# Altium PCB PCB_LogNController-v1.1.PcbDoc (part 2 of 3)
Units mil, origin at the board's own origin, x right, y up, seen from the top; angles counter-clockwise.
Board outline 7018 x 7081 mil, 2 copper layers (Top Layer, Bottom Layer), stack 61.811 mil thick; 172 components, 114 nets, 574 pads, 361 vias.
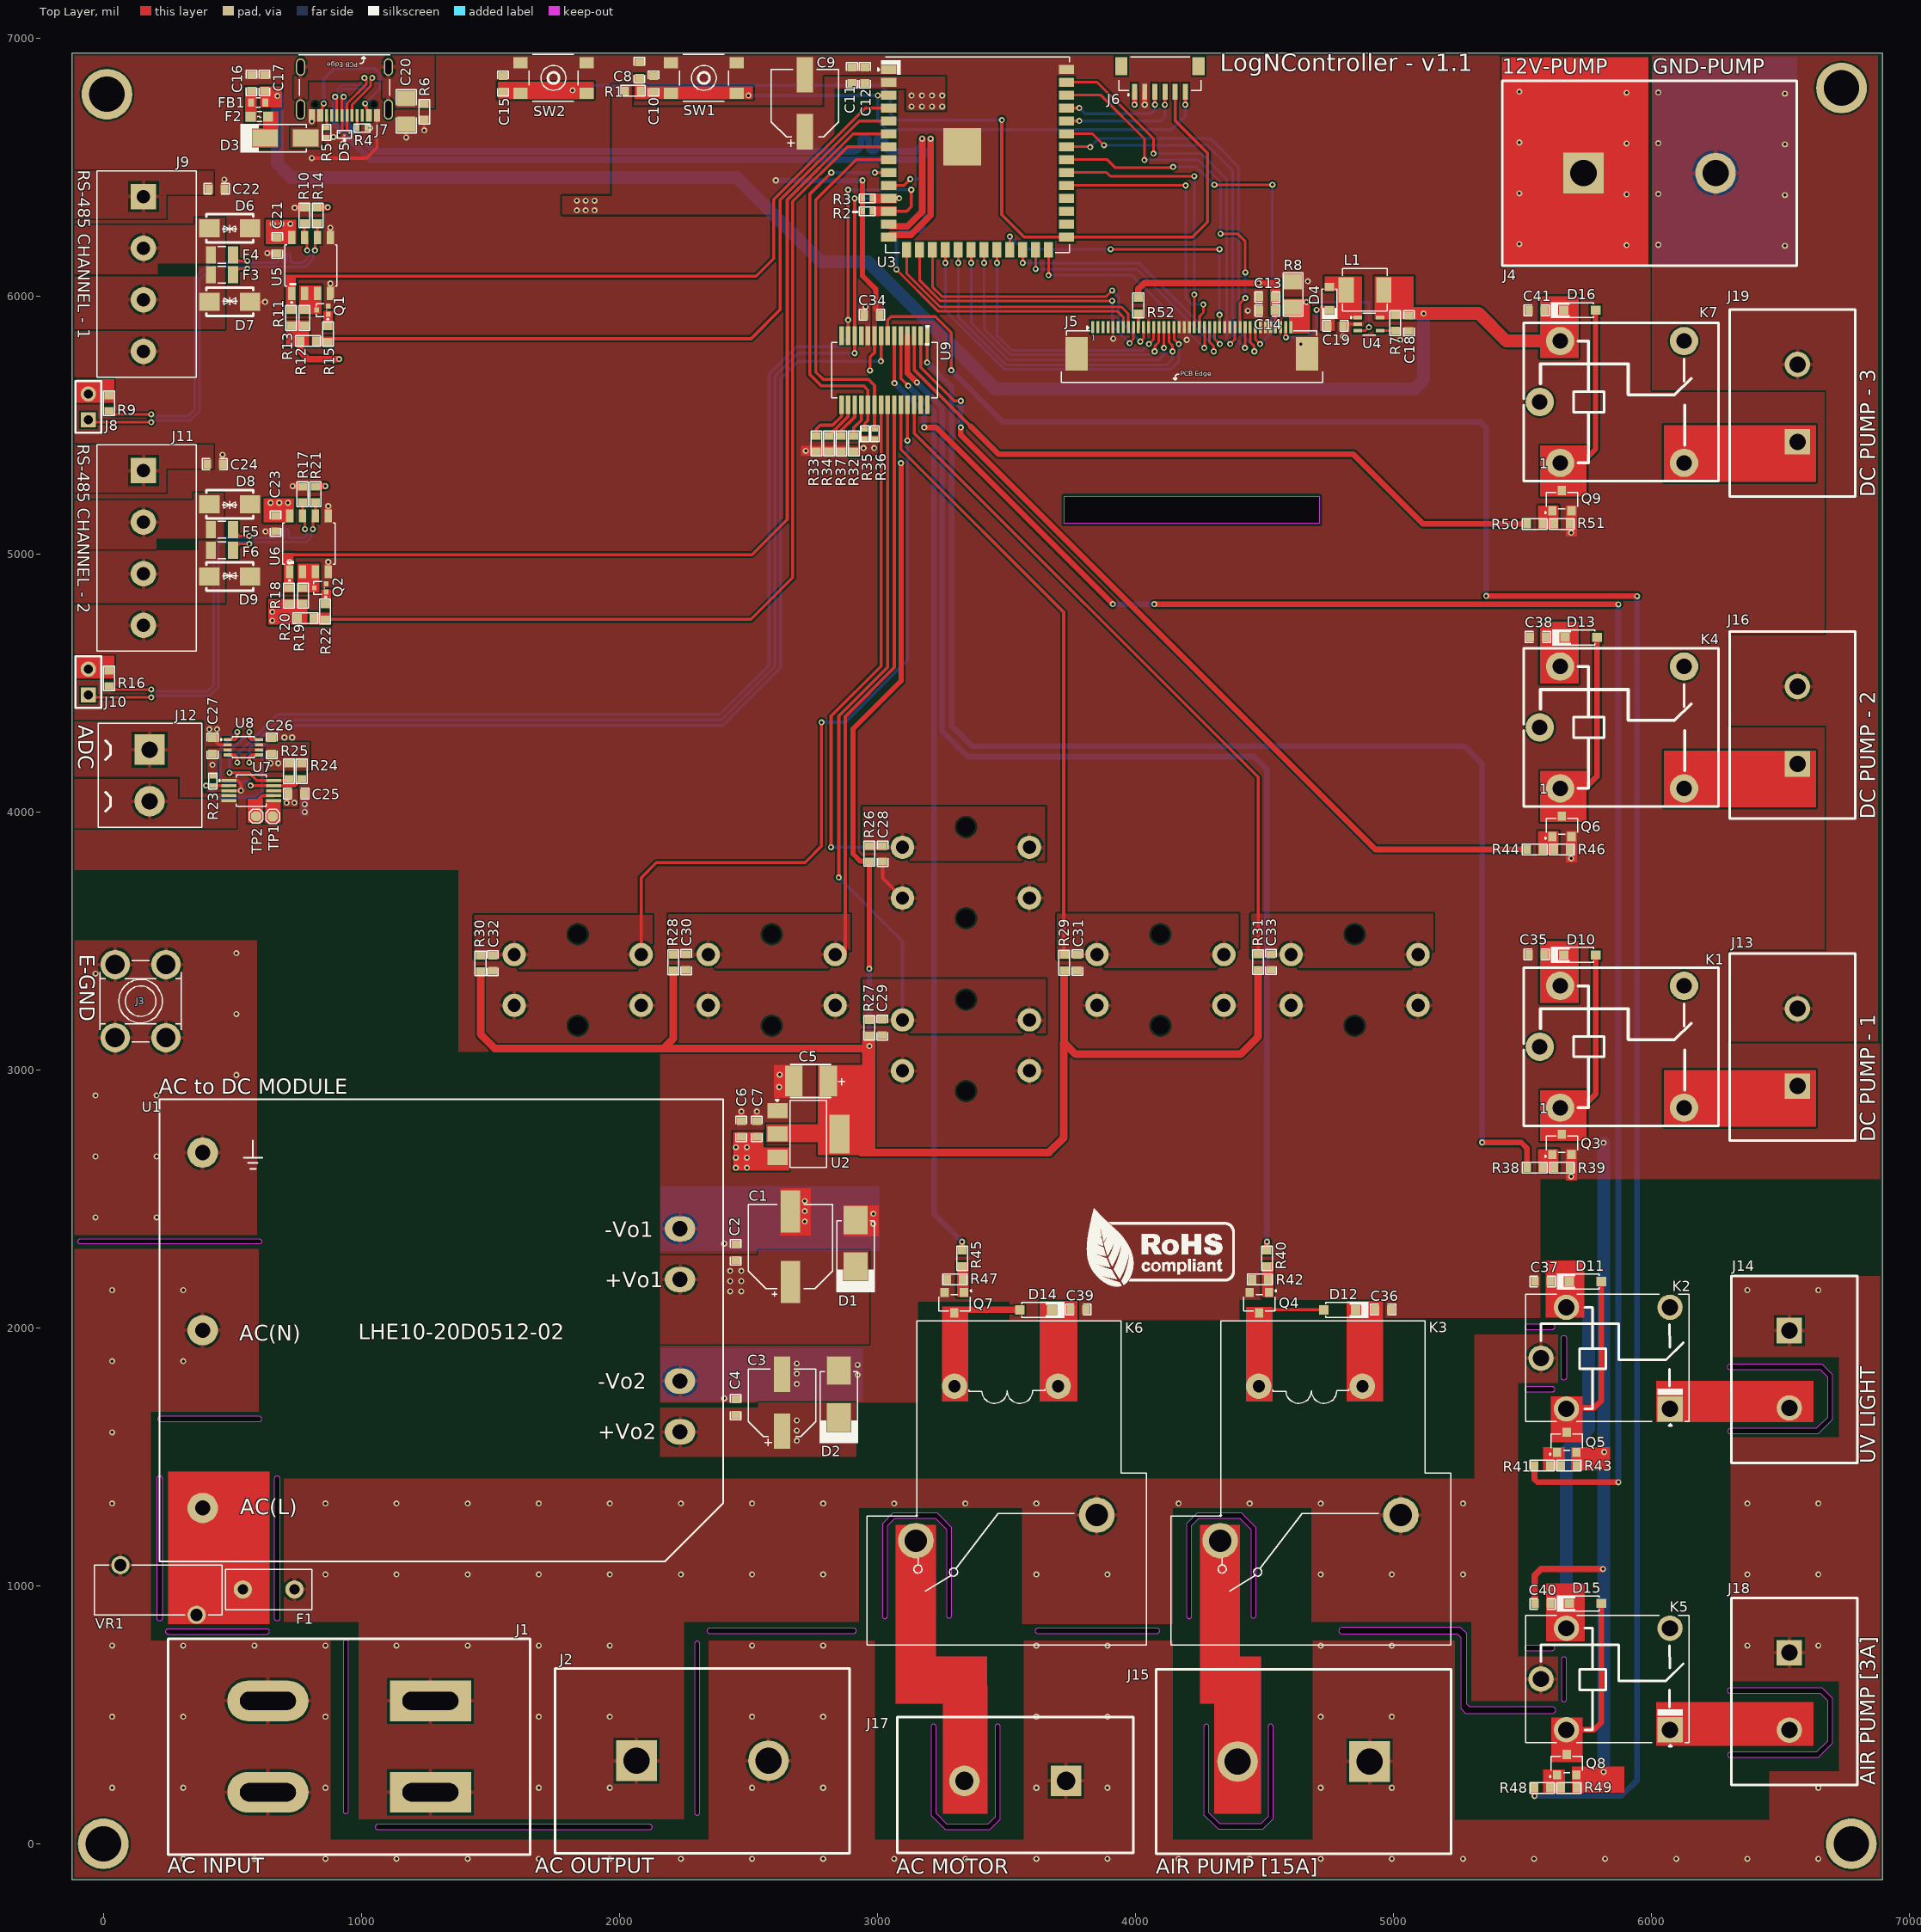
[diagram p0: Top Layer view]

## Part data (continued)
FB1: "FERRITE BEAD 120 OHM 0603 1LN", Case Code (Imperial)=0603, Case Code (Metric)=1608, Current Rating=3A, DC Resistance (DCR)=25mR, Frequency=100MHz, LCSC Part Number=C113030, Manufacturer=Murata, Max Operating Temperature=125°C, Min Operating Temperature=-55°C, Package Quantity=1, Tolerance=25%, Case/Package=0603, Category="Ferrite Beads and Chips", ComponentLink1Description=https://datasheet.ciiva.com/1012/l0110s0100blm18s-1012624.pdf?src-supplier=Digi-Key, ComponentLink1URL=https://datasheet.ciiva.com/1012/l0110s0100blm18s-1012624.pdf?src-supplier=Digi-Key, ComponentLink2Description=https://datasheet.ciiva.com/11799/0900766b811b5866-11799181.pdf?src-supplier=RSComponents, ComponentLink2URL=https://datasheet.ciiva.com/11799/0900766b811b5866-11799181.pdf?src-supplier=RSComponents, ComponentLink3Description=https://datasheet.ciiva.com/18093/getdatasheetpartid-295885-18093249.pdf?src-supplier=Verical, ComponentLink3URL=https://datasheet.ciiva.com/18093/getdatasheetpartid-295885-18093249.pdf?src-supplier=Verical, ComponentLink4Description=https://datasheet.ciiva.com/41449/001171723-da-01-en-chip-drossel0603-120r-3000ma-1-6x0-8mm-41449353.pdf?src-supplier=Conrad, ComponentLink4URL=https://datasheet.ciiva.com/41449/001171723-da-01-en-chip-drossel0603-120r-3000ma-1-6x0-8mm-41449353.pdf?src-supplier=Conrad, ComponentLink5Description=https://datasheet.ciiva.com/41449/001172312-da-01-en-drossel-0603-120r-1-6x0-8mm-10000st-41449675.pdf?src-supplier=Conrad, ComponentLink5URL=https://datasheet.ciiva.com/41449/001172312-da-01-en-drossel-0603-120r-1-6x0-8mm-10000st-41449675.pdf?src-supplier=Conrad, ComponentLink6Description=https://datasheet.ciiva.com/8021/5151-8021511.pdf?src-supplier=Element14, ComponentLink6URL=https://datasheet.ciiva.com/8021/5151-8021511.pdf?src-supplier=Element14, ComponentLink7Description=https://datasheet.ciiva.com/8021/5151-8021512.pdf?src-supplier=Element14, ComponentLink7URL=https://datasheet.ciiva.com/8021/5151-8021512.pdf?src-supplier=Element14, ComponentLink8Description=https://datasheet.ciiva.com/14122/blm-series-eng-tds-14122906.pdf?src-supplier=Distrelec, ComponentLink8URL=https://datasheet.ciiva.com/14122/blm-series-eng-tds-14122906.pdf?src-supplier=Distrelec, ComponentLink9Description=https://datasheet.ciiva.com/1012/l0110s0100blm18s-1012623.pdf?src-supplier=Digi-Key, ComponentLink9URL=https://datasheet.ciiva.com/1012/l0110s0100blm18s-1012623.pdf?src-supplier=Digi-Key, ComponentLink10Description=https://datasheet.ciiva.com/1012/l0110s0100blm18s-1012625.pdf?src-supplier=Digi-Key, ComponentLink10URL=https://datasheet.ciiva.com/1012/l0110s0100blm18s-1012625.pdf?src-supplier=Digi-Key, ComponentLink11Description=https://datasheet.ciiva.com/16395/l0110s0100blm18s-16395498.pdf?src-supplier=Future+Electronics, ComponentLink11URL=https://datasheet.ciiva.com/16395/l0110s0100blm18s-16395498.pdf?src-supplier=Future+Electronics, Core Material=Ferrite, DC Resistance-Max=25mR, Depth=0.8mm, Height=0.8mm, Impedance=120R, Item Type="Ferrite Bead", Lead Free="Lead Free", Length=1.6mm, Manufacturer Part Number=BLM18SG121TN1D, Material=Steel,Ferrite, Max Current Rating=3A, Max DC Current=3A, Number of Circuits=1, Number of Lines=1, Number of Pins=2, Packaging="Tape and Reel", Pricing 1="1=0.12640, 10=0.08350, 25=0.07210, 100=0.05150, 250=0.04730, 500=0.04110, 1000=0.03420, 3000=0.03360, 6000=0.03320, 15000=0.03270, 30000=0.03200, 75000=0.03150 (USD)", Reach SVHC Compliant=Yes, RoHS=Yes, RoHS Compliant=Yes, Series=BLM18S, Shielding=Unshielded, Stock 1=82612, Supplier 1="Arrow Electronics", Supplier Part Number 1=BLM18SG121TN1D, Termination=SMD/SMT, Test Frequency=100MHz, Width=0.8mm
J1: "1x2P Barrier Block 2 1 16mm -40℃~+105℃ 76A 1kV Black 6~14 Straight pin 16 Plugin,P=16mm Barrier Terminal Blocks ROHS", LCSC Part Number=C707749, Manufacturer="CiXi KaiFeng Electronics", ComponentLink1Description=LCSC, ComponentLink1URL=https://www.lcsc.com/product-detail/Barrier-Terminal-Blocks_Cixi-Kefa-Elec-KF88SA-16-0-2P_C707749.html, Item Type="Terminal Block", Manufacturer Part Number=KF88SA-16.0-2P, RoHS=No, Supplier=LCSC
J2 J4 J15: "1x2P Midfoot Barrier Block 2 1 13mm 40A -40℃~+105℃ 750V Black 10~18 Straight pin 6 Plugin,P=13mm Barrier Terminal Blocks ROHS", LCSC Part Number=C707721, Manufacturer="CiXi KaiFeng Electronics", Item Type="Terminal Block", Manufacturer Part Number=KF78C-13.0-2P, RoHS=No, Supplier=LCSC
J3: "M4 Plugin PCB Welding Terminal ROHS", Manufacturer=XFCN, Package=Plugin, ComponentLink1Description=LCSC, Manufacturer Part Number=T44001
J5: "SMD,P=0.5mm,Surface Mount，Right Angle", LCSC Part Number=C262648, Manufacturer=Jushuo, Item Type="FFC/FPC Connector", Manufacturer Part Number=AFC07-S40ECA-00, RoHS=No, Supplier=LCSC
J6: library part C145963, "1x6P SH 1 1mm 6 SMD,P=1mm Wire To Board / Wire To Wire Connector ROHS", Manufacturer=BOOMELE, Package=SMD,P=1mm, ComponentLink1Description=LCSC, ComponentLink1URL=https://www.lcsc.com/product-detail/Wire-To-Board-Wire-To-Wire-Connector_BOOMELE-Boom-Precision-Elec-C145963_C145963.html, Item Type=Connector, LCSC Part Number=C145963, Manufacturer Part Number=C145963
J7: "5A 1 16P Female Type-C SMD USB Connectors ROHS", LCSC Part Number=C165948, Manufacturer="Korean Hroparts Elec", ComponentLink1Description=LCSC, ComponentLink1URL=https://www.lcsc.com/product-detail/USB-Connectors_Korean-Hroparts-Elec-TYPE-C-31-M-12_C165948.html, Item Type="USB Connector", Manufacturer Part Number=TYPE-C-31-M-12
J8 J10: "Gold 250V 3A Straight Square Pins 2.5mm 2P 260℃ 6mm -40℃~+105℃ 3mm 2.54mm Plugin Black Brass 1x2P Plugin,P=2.54mm Pin Headers ROHS", LCSC Part Number=C706874, Manufacturer=XKB, Package=Plugin,P=2.54mm, ComponentLink1Description=LCSC, ComponentLink1URL=https://www.lcsc.com/product-detail/Pin-Headers_XKB-Connectivity-X6511WV-02H-C60D30_C706874.html, Item Type="Male Header", Manufacturer Part Number=X6511WV-02H-C60D30
J9 J11: "TERM BLK 4P SIDE ENT 5.08MM PCB", Manufacturer="Phoenix Contact", Supplier Part Number=277-1265-ND, ComponentLink1Description=https://datasheet.ciiva.com/16071/1715747-16071928.pdf?src-supplier=Onlinecomponents.com, ComponentLink1URL=https://datasheet.ciiva.com/16071/1715747-16071928.pdf?src-supplier=Onlinecomponents.com, ComponentLink2Description=https://datasheet.ciiva.com/23596/100425-23596240.pdf?src-supplier=Newark, ComponentLink2URL=https://datasheet.ciiva.com/23596/100425-23596240.pdf?src-supplier=Newark, ComponentLink3Description=https://datasheet.ciiva.com/15169/getdatasheetpartid-227081-15169962.pdf?src-supplier=Verical, ComponentLink3URL=https://datasheet.ciiva.com/15169/getdatasheetpartid-227081-15169962.pdf?src-supplier=Verical, ComponentLink4Description=https://datasheet.ciiva.com/11757/0900766b811d7317-11757713.pdf?src-supplier=Rs, ComponentLink4URL=https://datasheet.ciiva.com/11757/0900766b811d7317-11757713.pdf?src-supplier=Rs, ComponentLink5Description=https://datasheet.ciiva.com/824/1715747-824336.pdf?src-supplier=Digikey, ComponentLink5URL=https://datasheet.ciiva.com/824/1715747-824336.pdf?src-supplier=Digikey, ComponentLink6Description=https://datasheet.ciiva.com/1120/1731555-1120440.pdf?src-supplier=Farnell, ComponentLink6URL=https://datasheet.ciiva.com/1120/1731555-1120440.pdf?src-supplier=Farnell, ComponentLink7Description=https://datasheet.ciiva.com/1118/1731555-1118428.pdf?src-supplier=Element14, ComponentLink7URL=https://datasheet.ciiva.com/1118/1731555-1118428.pdf?src-supplier=Element14, ComponentLink8Description=https://datasheet.ciiva.com/33106/1715747-33106010.pdf?src-supplier=Today+Components, ComponentLink8URL=https://datasheet.ciiva.com/33106/1715747-33106010.pdf?src-supplier=Today+Components, ComponentLink9Description=https://datasheet.ciiva.com/29218/743477-da-01-en-printklemmenblock-mkds-1-5-4-5-08-29218070.pdf?src-supplier=Conrad, ComponentLink9URL=https://datasheet.ciiva.com/29218/743477-da-01-en-printklemmenblock-mkds-1-5-4-5-08-29218070.pdf?src-supplier=Conrad, Item Type="Terminal Blocks", Manufacturer Part Number=1715747, Pricing="1=2.39, 10=2.287, 50=2.188, 100=2.1282, 250=1.989, 500=1.82988, 1000=1.79562 (USD)", RoHS=Yes, Stock=3401, Supplier=Digikey
J12: "1x2P 18A -40℃~+105℃ 250V Black 12~30 Straight pin 5.08mm 2.5 1 2 Plugin,P=5.08mm Screw terminal ROHS", LCSC Part Number=C430601, Manufacturer=DIBO, Package=Plugin,P=5.08mm, ComponentLink1Description=LCSC, ComponentLink1URL=https://www.lcsc.com/product-detail/Screw-terminal_span-style-background-color-ff0-DIBO-span-DB128L-5-08-2P-BK-S_C430601.html, Item Type="Terminal Block", Manufacturer Part Number=DB128L-5.08-2P-BK-S
J13 J14 J16 J18 J19: "1x2P Midfoot Barrier Block 2 1 7.62mm 24A -40℃~+105℃ 250V Black 12~22 Straight pin 2.5 Plugin,P=7.62mm Barrier Terminal Blocks ROHS", LCSC Part Number=C707609, Manufacturer="CiXi KaiFeng Electronics", ComponentLink1Description=LCSC, ComponentLink1URL=https://www.lcsc.com/product-detail/Barrier-Terminal-Blocks_Cixi-Kefa-Elec-KF28C-7-62-2P_C707609.html, Item Type="Terminal Block", Manufacturer Part Number=KF28C-7.62-2P, RoHS=No, Supplier=LCSC
J17: "1x2P Midfoot Barrier Block 2 1 10mm -40℃~+105℃ 32A 750V Black 12~22 Straight pin 4 Plugin,P=10mm Barrier Terminal Blocks ROHS", LCSC Part Number=C707693, Manufacturer="CiXi KaiFeng Electronics", ComponentLink1Description=LCSC, ComponentLink1URL=https://www.lcsc.com/product-detail/Barrier-Terminal-Blocks_Cixi-Kefa-Elec-KF58C-10-0-2P_C707693.html, Item Type="Terminal Block", Manufacturer Part Number=KF58C-10.0-2P, RoHS=No, Supplier=LCSC
K1 K4 K7: "250V@AC 5V 15A SPDT (1 Form C) Plugin,15.6x19.2mm Power Relays ROHS", LCSC Part Number=C35449, Manufacturer="Ningbo Songle Relay", Package=Plugin,15.6x19.2mm, ComponentLink1Description=LCSC, ComponentLink1URL=https://www.lcsc.com/product-detail/Power-Relays_Ningbo-Songle-Relay-SRD-05VDC-SL-C_C35449.html, Item Type=Relays, Manufacturer Part Number=SRD-05VDC-SL-C
K2 K5: "5V 10A 20A@14VAC SPDT (1 Form C) 5 Plugin,12.4x16mm Power Relays ROHS", LCSC Part Number=C99666, Manufacturer="Ningbo Songle Relay", Package=Plugin,12.4x16mm, ComponentLink1Description=LCSC, ComponentLink1URL=https://www.lcsc.com/product-detail/Power-Relays_Ningbo-Songle-span-style-background-color-ff0-Relay-span-SRA-05VDC-CL_C99666.html, Item Type=Relay, Manufacturer Part Number=SRA-05VDC-CL
K3 K6: "250V@AC 5V 30A Normal Open:1A(SPST-Normal Open) Plugin,27.6x32mm Power Relays ROHS", LCSC Part Number=C250645, Manufacturer="Ningbo Songle Relay", Package=Plugin,27.6x32mm, ComponentLink1Description=LCSC, ComponentLink1URL=https://www.lcsc.com/product-detail/Power-Relays_Ningbo-Songle-Relay-SLA-05VDC-SL-A_C250645.html, Item Type=Relay, Manufacturer Part Number=SLA-05VDC-SL-A
L1: library part MWSA0402S-4R7MT, "Fixed Ind 4.7UH 2.8A 105MOHM SMD", LCSC Part Number=C408337, Manufacturer=Sunlord, Supplier Part Number 1=3442-MWSA0402S-4R7MTCT-ND, Category="Fixed Inductors", Item Type=Inductor, Manufacturer Part Number=MWSA0402S-4R7MT, Pricing 1="1=0.88000, 10=0.82100, 25=0.75760, 50=0.63120, 100=0.59340, 250=0.53024, 500=0.45450, 1000=0.40400 (USD)", RoHS=No, Stock 1=2808, Supplier 1=Digi-Key
Q1 Q2: "40V 100mW 100@10mA,1V 200mA 300MHz 300mV@50mA,5mA NPN -55℃~+150℃@(Tj) SOT-723 Bipolar Transistors - BJT ROHS", LCSC Part Number=C2923360, Manufacturer="TECH PUBLIC", Package=SOT-723, ComponentLink1Description=LCSC, ComponentLink1URL=https://www.lcsc.com/product-detail/Bipolar-Transistors-BJT_TECH-PUBLIC-MMBT3904M_C2923360.html, Item Type=Mosfet, Manufacturer Part Number=MMBT3904M
Q3 Q4 Q5 Q6 Q7 Q8 Q9: "TRANS NPN 40V 0.6A SMD SOT23-3", Case/Package=SOT-23, Collector Base Voltage (VCBO)=75V, Collector Emitter Breakdown Voltage=40V, Collector Emitter Saturation Voltage=1V, Continuous Collector Current=600mA, Current=1A, Emitter Base Voltage (VEBO)=6V, Frequency=300MHz, LCSC Part Number=C94515, Manufacturer=Diodes, Max Operating Temperature=150°C, Max Power Dissipation=300mW, Min Operating Temperature=-55°C, Package Quantity=3000, Power Dissipation=350mW, Supplier Part Number 1=MMBT2222A-FDIDKR-ND, Collector Emitter Voltage (VCEO)=40V, ComponentLink1Description=http://www.diodes.com/datasheets/ds30041.pdf?src-supplier=Future+Electronics, ComponentLink1URL=http://www.diodes.com/datasheets/ds30041.pdf?src-supplier=Future+Electronics, ComponentLink2Description=http://www.diodes.com/datasheets/ds30041.pdf?src-supplier=Avnet, ComponentLink2URL=http://www.diodes.com/datasheets/ds30041.pdf?src-supplier=Avnet, ComponentLink3Description=https://www.verical.com/server-webapp/html/getDatasheet?partID=82692&src-supplier=Verical, ComponentLink3URL=https://www.verical.com/server-webapp/html/getDatasheet?partID=82692&src-supplier=Verical, ComponentLink4Description=https://www.diodes.com/assets/Datasheets/ds30041.pdf?src-supplier=Digi-Key, ComponentLink4URL=https://www.diodes.com/assets/Datasheets/ds30041.pdf?src-supplier=Digi-Key, ComponentLink5Description=http://www.diodes.com/datasheets/ds30041.pdf?src-supplier=Avnet+Europe, ComponentLink5URL=http://www.diodes.com/datasheets/ds30041.pdf?src-supplier=Avnet+Europe, ComponentLink6Description=http://www.diodes.com/datasheets/ds30041.pdf?src-supplier=Element14, ComponentLink6URL=http://www.diodes.com/datasheets/ds30041.pdf?src-supplier=Element14, Contact Plating=Matte,Tin, Current Rating=600mA, Element Configuration=Single, Gain Bandwidth Product=300MHz, Height=1mm, hFE Min=100, Item Type=Mosfet, Lead Free="Lead Free", Length=3.05mm, Manufacturer Part Number=MMBT2222A-7-F, Max Breakdown Voltage=40V, Max Collector Current=600mA, Max Frequency=300MHz, Mount="Surface Mount", Number of Elements=1, Number of Pins=3, Packaging="Tape and Reel", Polarity=NPN, Pricing 1="1=0.15, 10=0.134, 100=0.0729, 500=0.04486, 1000=0.03059 (USD)", Radiation Hardening=No, REACH SVHC="No SVHC", Stock 1=2471182, Supplier 1=Digi-Key, Termination=SMD/SMT, Transition Frequency=300MHz, Voltage=40V, Voltage Rating (DC)=40V, Weight=0.000282oz, Width=1.4mm
R1 R7 R24 R25 R26 R27 R28 R29 R30 R31 R32 R33 R34 R37 R39 R42 R43 R46 R47 R49 R51 R52: library part RC0603FR-0710KL, "RES SMD 10K Ohm 1% 1/10W 0603", Case Code (Imperial)=0603, Case Code (Metric)=1608, LCSC Part Number=C98220, Manufacturer=Yageo, Max Operating Temperature=155°C, Max Power Dissipation=100mW, Min Operating Temperature=-55°C, Resistance=10kR, Resistance Tolerance=1%, Resistor Type="Thick Film", Supplier Part Number 1=311-10.0KHRCT-ND, Temperature Coefficient=100ppm/°C, Voltage Rating=75V, Voltage Rating (DC)=50V, Case/Package=0603, Category="Chip SMD Resistors", ComponentLink1Description=https://datasheet.ciiva.com/7660/38590-7660789.pdf?src-supplier=Element14, ComponentLink1URL=https://datasheet.ciiva.com/7660/38590-7660789.pdf?src-supplier=Element14, ComponentLink2Description=https://datasheet.ciiva.com/7983/443971-7983596.pdf?src-supplier=Element14, ComponentLink2URL=https://datasheet.ciiva.com/7983/443971-7983596.pdf?src-supplier=Element14, ComponentLink3Description=https://datasheet.ciiva.com/22747/443971-22747519.pdf?src-supplier=Element14, ComponentLink3URL=https://datasheet.ciiva.com/22747/443971-22747519.pdf?src-supplier=Element14, ComponentLink4Description=https://datasheet.ciiva.com/46440/1868787-46440891.pdf?src-supplier=Element14, ComponentLink4URL=https://datasheet.ciiva.com/46440/1868787-46440891.pdf?src-supplier=Element14, ComponentLink5Description=https://datasheet.ciiva.com/7746/1738695-7746239.pdf?src-supplier=Element14, ComponentLink5URL=https://datasheet.ciiva.com/7746/1738695-7746239.pdf?src-supplier=Element14, ComponentLink6Description=https://datasheet.ciiva.com/15189/getdatasheetpartid-409289-15189591.pdf?src-supplier=Verical, ComponentLink6URL=https://datasheet.ciiva.com/15189/getdatasheetpartid-409289-15189591.pdf?src-supplier=Verical, Construction=Rectangular, Depth=0.8mm, Features="Moisture Resistant", Height=0.45mm, Item Type=Resistor, Lead Free="Lead Free", Lead Pitch=0.3mm, Length=1.6mm, Manufacturer Part Number=RC0603FR-0710KL, Military Standard=Not, Number of Pins=2, Number of Terminations=2, Packaging="Tape and Reel", Power Rating=100mW, Pricing 1="1=0.10000, 10=0.02400, 100=0.00970, 1000=0.00436, 2500=0.00378 (USD)", REACH SVHC=Unknown, RoHS=Yes, RoHS Compliant=Yes, Series=RC, Size Code=0603, Stock 1=25249139, Supplier 1=Digi-Key, Termination=SMD/SMT, Tolerance=1%, Weight=7.1E-05oz, Width=0.8mm
R2 R3 R23 R35 R36: library part RC0402FR-074K7L, "RES 4.7K OHM 1% 1/16W 0402", Case Code (Imperial)=0402, Case Code (Metric)=1005, LCSC Part Number=C105871, Manufacturer=Yageo, Max Operating Temperature=155°C, Max Power Dissipation=63mW, Min Operating Temperature=-55°C, Power Rating=62.5mW, Resistance=4.7kR, Resistance Tolerance=1%, Resistor Type="Thick Film", Temperature Coefficient=100ppm/°C, Voltage Rating=50V, Case/Package=0402, Category="Chip SMD Resistors", ComponentLink1Description=https://datasheet.ciiva.com/22661/1686128-22661342.pdf?src-supplier=Element14, ComponentLink1URL=https://datasheet.ciiva.com/22661/1686128-22661342.pdf?src-supplier=Element14, ComponentLink2Description=https://datasheet.ciiva.com/7850/1018594-7850022.pdf?src-supplier=Element14, ComponentLink2URL=https://datasheet.ciiva.com/7850/1018594-7850022.pdf?src-supplier=Element14, ComponentLink3Description=https://datasheet.ciiva.com/7850/1018594-7850023.pdf?src-supplier=Element14, ComponentLink3URL=https://datasheet.ciiva.com/7850/1018594-7850023.pdf?src-supplier=Element14, ComponentLink4Description=https://datasheet.ciiva.com/15215/getdatasheetpartid-328119-15215035.pdf?src-supplier=Verical, ComponentLink4URL=https://datasheet.ciiva.com/15215/getdatasheetpartid-328119-15215035.pdf?src-supplier=Verical, Construction=Rectangular, Depth=0.5mm, Features="Moisture Resistant", Height=0.32mm, Height - Seated (Max)=0.016inch, Item Type=Resistor, Lead Free="Lead Free", Length=1mm, Manufacturer Part Number=RC0402FR-074K7L, Military Standard=Not, Number of Pins=2, Number of Terminations=2, Packaging="Tape and Reel", Pricing 1="10000=0.00085 (USD)", Reach SVHC Compliant=Yes, RoHS=Yes, RoHS Compliant=Yes, Series=RC, Size Code=0402, Stock 1=2420000, Supplier 1=Avnet, Supplier Part Number 1=RC0402FR-074K7L, Termination=SMD/SMT, Tolerance=1%, Voltage Rating (DC)=50V, Width=0.5mm
R4 R5: library part RC0402FR-075K1L, "RES 5.1K OHM 1% 1/16W 0402", Case Code (Imperial)=0402, Case Code (Metric)=1005, LCSC Part Number=C105872, Manufacturer=Yageo, Max Operating Temperature=155°C, Max Power Dissipation=63mW, Min Operating Temperature=-55°C, Package Quantity=1, Resistance=5.1kR, Resistance Tolerance=1%, Resistor Type="Thick Film", Temperature Coefficient=100ppm/°C, Voltage Rating=50V, Case/Package=0402, Category="Chip SMD Resistors", ComponentLink1Description=https://datasheet.ciiva.com/7983/1018594-7983519.pdf?src-supplier=Element14, ComponentLink1URL=https://datasheet.ciiva.com/7983/1018594-7983519.pdf?src-supplier=Element14, ComponentLink2Description=https://datasheet.ciiva.com/46394/1018594-46394936.pdf?src-supplier=Element14, ComponentLink2URL=https://datasheet.ciiva.com/46394/1018594-46394936.pdf?src-supplier=Element14, ComponentLink3Description=https://datasheet.ciiva.com/2453/pyu-r-int-thick-7-2453401.pdf?src-supplier=Digi-Key, ComponentLink3URL=https://datasheet.ciiva.com/2453/pyu-r-int-thick-7-2453401.pdf?src-supplier=Digi-Key, ComponentLink4Description=https://datasheet.ciiva.com/2453/pyu-r-int-thick-7-2453402.pdf?src-supplier=Digi-Key, ComponentLink4URL=https://datasheet.ciiva.com/2453/pyu-r-int-thick-7-2453402.pdf?src-supplier=Digi-Key, ComponentLink5Description=https://datasheet.ciiva.com/2453/pyu-r-int-thick-7-2453400.pdf?src-supplier=Digi-Key, ComponentLink5URL=https://datasheet.ciiva.com/2453/pyu-r-int-thick-7-2453400.pdf?src-supplier=Digi-Key, ComponentLink6Description=https://datasheet.ciiva.com/12558/pyu-rc0402-51-rohs-l-6-r-8721-12558460.pdf?src-supplier=Mouser, ComponentLink6URL=https://datasheet.ciiva.com/12558/pyu-rc0402-51-rohs-l-6-r-8721-12558460.pdf?src-supplier=Mouser, ComponentLink7Description=https://datasheet.ciiva.com/16744/pyu-rc0402-51-rohs-l-6-r-16744283.pdf?src-supplier=Future+Electronics, ComponentLink7URL=https://datasheet.ciiva.com/16744/pyu-rc0402-51-rohs-l-6-r-16744283.pdf?src-supplier=Future+Electronics, ComponentLink8Description=https://datasheet.ciiva.com/15189/getdatasheetpartid-323636-15189493.pdf?src-supplier=Verical, ComponentLink8URL=https://datasheet.ciiva.com/15189/getdatasheetpartid-323636-15189493.pdf?src-supplier=Verical, Construction=Rectangular, Depth=0.5mm, Features="Moisture Resistant", Height=0.016inch, Item Type=Resistor, Lead Free="Lead Free", Length=1mm, Manufacturer Part Number=RC0402FR-075K1L, Military Standard=Not, Number of Terminations=2, Packaging="Tape and Reel", Power Rating=63mW, Pricing 1="10000=0.00085 (USD)", RoHS=Yes, RoHS Compliant=Yes, Series=RC, Stock 1=65000, Supplier 1=Avnet, Supplier Part Number 1=RC0402FR-075K1L, Technology="THICK FILM", Termination=SMD/SMT, Tolerance=1%, Voltage Rating (DC)=50V, Width=0.02inch, Working Voltage=50V
R6: library part RC0603FR-071ML, "RES SMD 1M OHM 1% 1/10W 0603", Case Code (Imperial)=0603, Case Code (Metric)=1608, LCSC Part Number=C105578, Manufacturer=Yageo, Max Operating Temperature=155°C, Min Operating Temperature=-55°C, Package Quantity=5000, Power Rating=100mW, Resistance=1MR, Supplier Part Number 1=311-1.00MHRDKR-ND, Temperature Coefficient=100ppm/°C, Tolerance=1%, Voltage Rating=50V, Case/Package=0603, ComponentLink1Description=http://www.farnell.com/datasheets/2167052.pdf?src-supplier=Mouser, ComponentLink1URL=http://www.farnell.com/datasheets/2167052.pdf?src-supplier=Mouser, ComponentLink2Description=http://www.farnell.com/datasheets/2167052.pdf?src-supplier=Element14, ComponentLink2URL=http://www.farnell.com/datasheets/2167052.pdf?src-supplier=Element14, ComponentLink3Description=http://documents.rs-components.com/techlib://itc_doclist_GB.htm?stockno=5048956&src-supplier=RSComponents, ComponentLink3URL=http://documents.rs-components.com/techlib://itc_doclist_GB.htm?stockno=5048956&src-supplier=RSComponents, Composition="Thick Film", Depth=0.8mm, Height=0.45mm, Item Type=Resistor, Lead Free="Lead Free", Length=1.6mm, Manufacturer Part Number=RC0603FR-071ML, Military Standard=Not, Number of Pins=2, Packaging="Tape and Reel", Pricing 1="1=0.1, 10=0.023, 100=0.0094, 1000=0.00421, 2500=0.00366 (USD)", REACH SVHC="No SVHC", Stock 1=3824601, Supplier 1=Digi-Key, Termination=SMD/SMT, Voltage Rating (DC)=50V, Width=0.8mm
R8: library part "FRC1206J6R2 TS", "250mW Thick Film Resistors 200V ±5% ±200ppm/℃ 6.2Ω 1206 Chip Resistor - Surface Mount ROHS", LCSC Part Number=C2907521, Manufacturer=FOJAN, Package=1206, Item Type=Resistor, Manufacturer Part Number="FRC1206J6R2 TS"
R9 R16: library part RC0603FR-07120RL, "RES 120 OHM 1% 1/10W 0603", Case Code (Imperial)=0603, Case Code (Metric)=1608, LCSC Part Number=C114640, Manufacturer=Yageo, Max Operating Temperature=155°C, Max Power Dissipation=100mW, Min Operating Temperature=-55°C, Package Quantity=1, Resistance Tolerance=1%, Resistor Type="Thick Film", Supplier Part Number 1=311-120HRCT-ND, Temperature Coefficient=100ppm/°C, Voltage Rating=50V, Case/Package=0603, Category="Chip SMD Resistors", ComponentLink1Description=https://datasheet.ciiva.com/2553/pyu-r-int-thick-7-2553512.pdf?src-supplier=Digi-Key, ComponentLink1URL=https://datasheet.ciiva.com/2553/pyu-r-int-thick-7-2553512.pdf?src-supplier=Digi-Key, ComponentLink2Description=https://datasheet.ciiva.com/7746/443971-7746248.pdf?src-supplier=Element14, ComponentLink2URL=https://datasheet.ciiva.com/7746/443971-7746248.pdf?src-supplier=Element14, ComponentLink3Description=https://datasheet.ciiva.com/2553/pyu-r-int-thick-7-2553513.pdf?src-supplier=Digi-Key, ComponentLink3URL=https://datasheet.ciiva.com/2553/pyu-r-int-thick-7-2553513.pdf?src-supplier=Digi-Key, ComponentLink4Description=https://datasheet.ciiva.com/7746/443971-7746249.pdf?src-supplier=Element14, ComponentLink4URL=https://datasheet.ciiva.com/7746/443971-7746249.pdf?src-supplier=Element14, ComponentLink5Description=https://datasheet.ciiva.com/2553/pyu-r-int-thick-7-2553514.pdf?src-supplier=Digi-Key, ComponentLink5URL=https://datasheet.ciiva.com/2553/pyu-r-int-thick-7-2553514.pdf?src-supplier=Digi-Key, ComponentLink6Description=https://datasheet.ciiva.com/46395/443971-46395021.pdf?src-supplier=Element14, ComponentLink6URL=https://datasheet.ciiva.com/46395/443971-46395021.pdf?src-supplier=Element14, Construction=Rectangular, Depth=0.8mm, Features="Moisture Resistant", Height=0.022inch, Item Type=Resistor, Lead Free="Lead Free", Length=1.6mm, Manufacturer Part Number=RC0603FR-07120RL, Military Standard=Not, Number of Pins=2, Number of Terminations=2, Packaging="Tape and Reel", Power Rating=100mW, Pricing 1="1=0.10000, 10=0.02400, 100=0.00970, 1000=0.00436, 2500=0.00378 (USD)", REACH SVHC="No SVHC", Resistance=120R, RoHS=Yes, RoHS Compliant=Yes, Series=RC, Size Code=0603, Stock 1=839061, Supplier 1=Digi-Key, Termination=SMD/SMT, Tolerance=1%, Voltage Rating (DC)=50V, Width=0.031inch
R10 R11 R12 R13 R14 R15 R17 R18 R19 R20 R21 R22: library part RC0603FR-074K7L, "RES SMD 4.7K OHM 1% 1/10W 0603", LCSC Part Number=C99782, Manufacturer=Yageo, Package=0603, ComponentLink7Description=LCSC, ComponentLink7URL=https://www.lcsc.com/product-detail/Chip-Resistor-Surface-Mount_YAGEO-RC0603FR-074K7L_C99782.html, Item Type=Resistor, Manufacturer Part Number=RC0603FR-074K7L
R38 R40 R41 R44 R45 R48 R50: library part RC0603FR-07470RL, "RES 470 OHM 1% 1/10W 0603", Case Code (Imperial)=0603, Case Code (Metric)=1608, LCSC Part Number=C114669, Manufacturer=Yageo, Max Operating Temperature=155°C, Max Power Dissipation=100mW, Min Operating Temperature=-55°C, Package Quantity=1, Resistance Tolerance=1%, Resistor Type="Thick Film", Supplier Part Number 1=311-470HRCT-ND, Temperature Coefficient=100ppm/°C, Voltage Rating=50V, Working Voltage=75V, Case/Package=0603, Category="Chip SMD Resistors", ComponentLink1Description=https://datasheet.ciiva.com/11808/0900766b80f96399-11808177.pdf?src-supplier=RSComponents, ComponentLink1URL=https://datasheet.ciiva.com/11808/0900766b80f96399-11808177.pdf?src-supplier=RSComponents, ComponentLink2Description=https://datasheet.ciiva.com/7746/1738695-7746359.pdf?src-supplier=Element14, ComponentLink2URL=https://datasheet.ciiva.com/7746/1738695-7746359.pdf?src-supplier=Element14, ComponentLink3Description=https://datasheet.ciiva.com/7746/1738695-7746360.pdf?src-supplier=Element14, ComponentLink3URL=https://datasheet.ciiva.com/7746/1738695-7746360.pdf?src-supplier=Element14, ComponentLink4Description=https://datasheet.ciiva.com/7660/1868787-7660793.pdf?src-supplier=Element14, ComponentLink4URL=https://datasheet.ciiva.com/7660/1868787-7660793.pdf?src-supplier=Element14, ComponentLink5Description=https://datasheet.ciiva.com/46440/1868787-46440907.pdf?src-supplier=Element14, ComponentLink5URL=https://datasheet.ciiva.com/46440/1868787-46440907.pdf?src-supplier=Element14, ComponentLink6Description=https://datasheet.ciiva.com/2454/pyu-r-int-thick-7-2454012.pdf?src-supplier=Digi-Key, ComponentLink6URL=https://datasheet.ciiva.com/2454/pyu-r-int-thick-7-2454012.pdf?src-supplier=Digi-Key, ComponentLink7Description=https://datasheet.ciiva.com/2454/pyu-r-int-thick-7-2454013.pdf?src-supplier=Digi-Key, ComponentLink7URL=https://datasheet.ciiva.com/2454/pyu-r-int-thick-7-2454013.pdf?src-supplier=Digi-Key, ComponentLink8Description=https://datasheet.ciiva.com/2454/pyu-r-int-thick-7-2454014.pdf?src-supplier=Digi-Key, ComponentLink8URL=https://datasheet.ciiva.com/2454/pyu-r-int-thick-7-2454014.pdf?src-supplier=Digi-Key, Construction=Rectangular, Depth=0.8mm, Features="Moisture Resistant", Height=0.022inch, Lead Free="Lead Free", Length=1.6mm, Manufacturer Part Number=RC0603FR-07470RL, Military Standard=Not, Number of Terminations=2, Packaging="Tape and Reel", Power Rating=100mW, Pricing 1="1=0.10000, 10=0.02400, 100=0.00970, 1000=0.00436, 2500=0.00378 (USD)", REACH SVHC="No SVHC", Resistance=470R, RoHS=Yes, RoHS Compliant=Yes, Series=RC, Stock 1=154083, Supplier 1=Digi-Key, Technology="THICK FILM", Termination=SMD/SMT, Tolerance=1%, Width=0.031inch
SW1 SW2: "No NO 50mA 4.5mm 100000 260gf 12V -30℃~+85℃ 4.5mm 4.3mm Black Round Button Brick nogging SPST SMD Tactile Switches ROHS", LCSC Part Number=C381037, Manufacturer="XKB Connectivity", Package=Custom, ComponentLink1Description=LCSC, ComponentLink1URL=https://www.lcsc.com/product-detail/Tactile-Switches_XKB-Connectivity-TS-1109S-C-B_C381037.html, Item Type=Switch, Manufacturer Part Number=TS-1109S-C-B
SW3 SW4 SW5 SW6 SW7 SW8: "SWITCH TACTILE SPST-NO 0.05A 24V", Color=54Colour, LCSC Part Number=C84931, Manufacturer=Omron, Supplier Part Number=36K1872, ComponentLink1Description=https://datasheet.ciiva.com/27056/2086688-27056647.pdf?src-supplier=Jameco, ComponentLink1URL=https://datasheet.ciiva.com/27056/2086688-27056647.pdf?src-supplier=Jameco, ComponentLink2Description=https://datasheet.ciiva.com/5283/b3f-0811-26083-5283663.pdf?src-supplier=Mouser, ComponentLink2URL=https://datasheet.ciiva.com/5283/b3f-0811-26083-5283663.pdf?src-supplier=Mouser, ComponentLink3Description=https://datasheet.ciiva.com/1532/611570-1532596.pdf?src-supplier=Element14, ComponentLink3URL=https://datasheet.ciiva.com/1532/611570-1532596.pdf?src-supplier=Element14, ComponentLink4Description=https://datasheet.ciiva.com/16154/en-b3f-16154911.pdf?src-supplier=Onlinecomponents.com, ComponentLink4URL=https://datasheet.ciiva.com/16154/en-b3f-16154911.pdf?src-supplier=Onlinecomponents.com, ComponentLink5Description=https://datasheet.ciiva.com/2900/b3f-0811-2900013.pdf?src-supplier=Digikey, ComponentLink5URL=https://datasheet.ciiva.com/2900/b3f-0811-2900013.pdf?src-supplier=Digikey, ComponentLink6Description=https://datasheet.ciiva.com/30212/en-b3f-30212214.pdf?src-supplier=Onlinecomponents.com, ComponentLink6URL=https://datasheet.ciiva.com/30212/en-b3f-30212214.pdf?src-supplier=Onlinecomponents.com, Item Type="Tactile Switche", Lead Free=5697LeadFree, Manufacturer Part Number=B3F-4055, Number of Positions=2NUMBER, Pricing="1=0.617, 10=0.574, 25=0.55, 50=0.525, 100=0.501 (USD)", RoHS=Yes, Stock=55, Supplier=Avnet
TP1 TP2: "Test Point ON", Item Type="Test Point", Manufacturer Part Number="TEST POINT 0.5mm Dia"
U1: "Power supply module ROHS", LCSC Part Number=C19192878, Manufacturer=LZTEC, Package=Custom, ComponentLink1Description=LCSC, ComponentLink1URL=https://www.lcsc.com/product-detail/Power-supply-module_LZTEC-LHE10-20D0512-02_C19192878.html, Item Type=Module, Manufacturer Part Number=LHE10-20D0512-02
U2: "SOT-223 Linear Voltage Regulators (LDO) ROHS", LCSC Part Number=C2992570, Manufacturer="GUOXIN JIAPIN SEMICONDUCTOR", Package=SOT-223, ComponentLink1Description=LCSC, ComponentLink1URL=https://www.lcsc.com/product-detail/Linear-Voltage-Regulators-LDO_GUOXIN-JIAPIN-SEMICONDUCTOR-AMS1117-3-3_C2992570.html, Item Type=IC, Manufacturer Part Number=AMS1117-3.3
U3: "RF TXRX MOD BLUETOOTH U.FL SMD", LCSC Part Number=C3013946, Manufacturer="Espressif Systems", Item Type=IC, Manufacturer Part Number=ESP32-S3-WROOM-1U-N16R8, Pricing="1=3.9 (USD)", RoHS=No, Stock=3681, Supplier=Digikey
U4: "IC LED DRV RGLTR PWM 1.8A SC70-5", LCSC Part Number=C71045, Manufacturer="Texas Instruments", Min Supply Voltage=2.7V, Nominal Supply Current=300uA, ComponentLink1Description=http://www.ti.com/general/docs/lit/getliterature.tsp?genericPartNumber=TPS61169&&fileType=pdf&src-supplier=Element14, ComponentLink1URL=http://www.ti.com/general/docs/lit/getliterature.tsp?genericPartNumber=TPS61169&&fileType=pdf&src-supplier=Element14, ComponentLink2Description=http://www.ti.com/lit/gpn/tps61169?src-supplier=Mouser, ComponentLink2URL=http://www.ti.com/lit/gpn/tps61169?src-supplier=Mouser, ComponentLink3Description=http://www.ti.com/general/docs/lit/getliterature.tsp?genericPartNumber=TPS61169&amp;&amp;fileType=pdf&src-supplier=Farnell, ComponentLink3URL=http://www.ti.com/general/docs/lit/getliterature.tsp?genericPartNumber=TPS61169&amp;&amp;fileType=pdf&src-supplier=Farnell, ComponentLink4Description=http://www.ti.com/general/docs/lit/getliterature.tsp?genericPartNumber=TPS61169&&fileType=pdf&src-supplier=Avnet, ComponentLink4URL=http://www.ti.com/general/docs/lit/getliterature.tsp?genericPartNumber=TPS61169&&fileType=pdf&src-supplier=Avnet, ComponentLink5Description=http://www.ti.com/lit/ds/symlink/tps61169.pdf?src-supplier=Digikey, ComponentLink5URL=http://www.ti.com/lit/ds/symlink/tps61169.pdf?src-supplier=Digikey, Item Type=IC, Manufacturer Part Number=TPS61169DCKR, Pricing="1=0.87, 10=0.748, 50=0.748, 100=0.577, 1000=0.403, 10000=0.343 (USD)", RoHS=Yes, Stock=3338, Supplier=Mouser, Thickness=900um
U5 U6: "SOP-8 RS-485/RS-422 ICs ROHS", LCSC Part Number=C519086, Manufacturer=HGSEMI, Package=SOP-8, ComponentLink1Description=LCSC, ComponentLink1URL=https://www.lcsc.com/product-detail/RS-485-RS-422-ICs_HGSEMI-SP3485EIM-TR_C519086.html, Item Type=IC, Manufacturer Part Number=SP3485EIM/TR
U7: "IC ADC 16BIT SIGMA-DELTA 10VSSOP", Case/Package=VSSOP, LCSC Part Number=C37593, Manufacturer="Texas Instruments", Max Operating Temperature=125°C, Max Supply Voltage=5.5V, Min Operating Temperature=-40°C, Min Supply Voltage=2V, Nominal Supply Current=150uA, Package Quantity=2500, Power Dissipation=900uW, Supplier Part Number=595-ADS1115IDGSR, Category="Analog to Digital Converters (ADCs)", ComponentLink1Description=https://datasheet.ciiva.com/4031/47725463s8438921n7713-4031028.pdf?src-supplier=Arrow+Electronics, ComponentLink1URL=https://datasheet.ciiva.com/4031/47725463s8438921n7713-4031028.pdf?src-supplier=Arrow+Electronics, Contact Plating=Gold, Conversion Rate=0.86KS/s, Height=1.07mm, Integral Nonlinearity (INL)=1LSB, Interface=I2C, Item Type=IC, Lead Free="Lead Free", Length=3mm, Manufacturer Part Number=ADS1115IDGSR, Max Supply Voltage (DC)=5.5V, Min Supply Voltage (DC)=2V, Number of A/D Converters=1, Number of Bits=16, Number of Channels=2, Number of Converters=1, Number of Inputs=4, Packaging="Tape and Reel", Pins=10, Polarity=Bipolar, Pricing="1=5.44, 10=4.76, 50=4.76, 100=4.01, 1000=2.88, 10000=2.78 (USD)", Reach SVHC Compliant=No, Resolution=16b, RoHS=Yes, RoHS Compliant=Yes, Sampling Rate=860S/s, Series=-, Stock=5925, Supplier=Mouser, Supply Type=Single, Thickness=1.02mm, Width=3mm
U8: "IC TRANSLTR BIDIRECTIONAL 8VSSOP", Case/Package=VSSOP, High Level Output Current=-20uA, LCSC Part Number=C53434, Low Level Output Current=1mA, Manufacturer="Texas Instruments", Max Operating Temperature=85°C, Max Supply Voltage=5.5V, Min Operating Temperature=-40°C, Min Supply Voltage=1.65V, Nominal Supply Current=14.4uA, Output Current=1A, Package Quantity=3000, Supplier Part Number=595-TXS0102DCUR, Category="Voltage Level Shifters", Channel Type=Bidirectional, ComponentLink1Description=https://datasheet.ciiva.com/22653/1846850-22653373.pdf?src-supplier=Farnell, ComponentLink1URL=https://datasheet.ciiva.com/22653/1846850-22653373.pdf?src-supplier=Farnell, ComponentLink2Description=https://datasheet.ciiva.com/15096/getdatasheetpartid-118249-15096172.pdf?src-supplier=Verical, ComponentLink2URL=https://datasheet.ciiva.com/15096/getdatasheetpartid-118249-15096172.pdf?src-supplier=Verical, ComponentLink3Description=https://datasheet.ciiva.com/1508/1857232-1508821.pdf?src-supplier=Element14, ComponentLink3URL=https://datasheet.ciiva.com/1508/1857232-1508821.pdf?src-supplier=Element14, ComponentLink4Description=https://datasheet.ciiva.com/28499/1863639-28499676.pdf?src-supplier=Element14, ComponentLink4URL=https://datasheet.ciiva.com/28499/1863639-28499676.pdf?src-supplier=Element14, ComponentLink5Description=https://datasheet.ciiva.com/46395/1863639-46395871.pdf?src-supplier=Element14, ComponentLink5URL=https://datasheet.ciiva.com/46395/1863639-46395871.pdf?src-supplier=Element14, ComponentLink6Description=https://datasheet.ciiva.com/1899/txs0102-1899369.pdf?src-supplier=Digikey, ComponentLink6URL=https://datasheet.ciiva.com/1899/txs0102-1899369.pdf?src-supplier=Digikey, ComponentLink7Description=https://datasheet.ciiva.com/1899/txs0102-1899368.pdf?src-supplier=Digikey, ComponentLink7URL=https://datasheet.ciiva.com/1899/txs0102-1899368.pdf?src-supplier=Digikey, ComponentLink8Description=https://datasheet.ciiva.com/1899/txs0102-1899370.pdf?src-supplier=Digikey, ComponentLink8URL=https://datasheet.ciiva.com/1899/txs0102-1899370.pdf?src-supplier=Digikey, ComponentLink9Description=https://datasheet.ciiva.com/14287/txs0102-14287516.pdf?src-supplier=Avnet, ComponentLink9URL=https://datasheet.ciiva.com/14287/txs0102-14287516.pdf?src-supplier=Avnet, ComponentLink10Description=https://datasheet.ciiva.com/14287/txs0102-14287518.pdf?src-supplier=Avnet, ComponentLink10URL=https://datasheet.ciiva.com/14287/txs0102-14287518.pdf?src-supplier=Avnet, Data Rate=24Mbps, Height=900um, Item Type=IC, Lead Free="Lead Free", Length=2.3mm, Logic Function=Translator, Manufacturer Part Number=TXS0102DCUR, Number of Bits=2, Number of Channels=2, Number of Circuits=1, Number of Inputs=2, Number of Outputs=2NUMBER, Packaging="Tape and Reel", Pins=8, Pricing="1=0.89, 10=0.739, 50=0.739, 100=0.561, 1000=0.383, 10000=0.313 (USD)", Propagation Delay=4.6ns, Quiescent Current=14.4uA, Radiation Hardening=No, Reach SVHC Compliant=No, RoHS=Yes, RoHS Compliant=Yes, Series=-, Stock=149802, Supplier=Mouser, Thickness=850um, Turn-On Delay Time=260ns, Weight=0.000339oz, Width=2mm
U9: "IC XPNDR 1.7MHZ I2C 28SSOP", Case/Package=SSOP, Clock Frequency=10MHz, Frequency=1.7MHz, LCSC Part Number=C558584, Manufacturer=Microchip, Max Operating Temperature=125°C, Min Operating Temperature=-40°C, Nominal Supply Voltage=5.5V, Output Current=25mA, Package Quantity=2100, Power Dissipation=700mW, Supplier Part Number 1=MCP23017T-E/SSCT-ND, Supply Current=1mA, Category="Interface ICs", ComponentLink1Description=https://datasheet.ciiva.com/12267/21952b-12267583.pdf?src-supplier=Mouser, ComponentLink1URL=https://datasheet.ciiva.com/12267/21952b-12267583.pdf?src-supplier=Mouser, ComponentLink2Description=https://datasheet.ciiva.com/8128/21952b-8128586.pdf?src-supplier=Avnet, ComponentLink2URL=https://datasheet.ciiva.com/8128/21952b-8128586.pdf?src-supplier=Avnet, ComponentLink3Description=https://datasheet.ciiva.com/16454/filehandler-aspxddocname-en023709-16454267.pdf?src-supplier=Future+Electronics, ComponentLink3URL=https://datasheet.ciiva.com/16454/filehandler-aspxddocname-en023709-16454267.pdf?src-supplier=Future+Electronics, ComponentLink4Description=https://datasheet.ciiva.com/1780/21952b-1780738.pdf?src-supplier=Digi-Key, ComponentLink4URL=https://datasheet.ciiva.com/1780/21952b-1780738.pdf?src-supplier=Digi-Key, Interface=I2C,Serial, Item Type=IC, Lead Free="Lead Free", Manufacturer Part Number=MCP23017T-E/SS, Mounting Technology="Surface Mount", Number of Bits=16, Number of Channels=1, Number of I/Os=16, Operating Supply Voltage=5.5V, Output Type=PUSH-PULL, Packaging="Tape and Reel", Pins=28, Pricing 1="1=1.69, 25=1.4, 100=1.28 (USD)", RoHS=Yes, RoHS Compliant=Yes, Series=-, Stock 1=26314, Supplier 1=Digi-Key
VR1: "775V 405V 300V 470V Plugin Varistors ROHS", LCSC Part Number=C179067, Manufacturer=Littelfuse, ComponentLink1Description=https://datasheet.ciiva.com/4541/littelfuse-mov-la-34212-4541978.pdf?src-supplier=Mouser, ComponentLink1URL=https://datasheet.ciiva.com/4541/littelfuse-mov-la-34212-4541978.pdf?src-supplier=Mouser, ComponentLink2Description=https://datasheet.ciiva.com/367/littelfuse-mov-la-367663.pdf?src-supplier=Digikey, ComponentLink2URL=https://datasheet.ciiva.com/367/littelfuse-mov-la-367663.pdf?src-supplier=Digikey, Item Type=Varistors, Manufacturer Part Number=V300LT20AP, Pricing="1=0.45, 10=0.398, 25=0.3736, 100=0.3048 (USD)", RoHS=Yes, Stock=3169, Supplier=Digikey

## Free pads (board coordinates)
  round 196.85 hole 137.8 unplated: MH(0,0) MH(14,6783) MH(6738,6807) MH(6776,0)

## Via types
v1: diameter 23.62, hole 11.81, Top Layer to Bottom Layer, 245 vias
v2: diameter 23.62, hole 11.81, Top Layer to Bottom Layer, tented both sides, 116 vias

## Nets (pads, with @x,y where several pads share a name; then routed paths per layer and width w, separated by ;. In a path a pad name is that pad's centre, name@x,y a point inside that pad or via, vN(x,y) a via of type N, cw(c..) or ccw(c..) an arc to the next point about the centre after c; other vN are vias at no path point)
3V3: C5.1 C9.1 C11.2 C12.2 C13.2 C14.2 C21.1 C23.1 C27.1 C34.1 J5.37 J6.1 R1.2 R2.2 R3.2 R11.1 R12.2 R13.2 R14.1 R18.1 R19.2 R20.2 R21.1 R23.2 R26.1 R27.1 R28.1 R29.1 R30.1 R31.1 R32.2 R35.2 R36.2 R52.2 U2.2 U2.4 U3.2 U5.8 U6.8 U8.3 U8.6 U9.9 | length 9008.1
  Top Layer w12: v2(2972,5712) 2972,5764 2989.48,5781.48 U9.9@2989.48,5846.86
  Top Layer w20: v2(2943,6449) R3.2@2943,6379 R2.2@2943,6329 2943,6079 2994,6028 2994,5953 2993,5952 ; v1(2969,3393) R26.1@2969,3808 ; 2970,3033 R27.1@2970,3133 ; R26.1@2970,3809 2969,3810 2934,3810 2906,3838 2906,4322 3092,4508 v2(3092,5353) ; v2(3997.57,6742.32) J6.1@3997.57,6792.3
  Top Layer w25: R12.2@764,5826 764,5785 793,5756 v1(914,5756) ; R21.1@823,5263.73 v1(861,5263.73) ; R14.1@832,6344.73 v1(870,6344.73) ; R52.2@4012,5994 4012.77,5994.77 4012.77,6028.77 4035,6051 4535.5,6051 4549,6051
  Top Layer w30: R30.1@1462,3383 1462,3139 1518,3083 2170,3083 ; R28.1@2210,3387 2210,3123 2170,3083 ; 2937,2680 3666,2680 3723,2737 3723,3105 ; 2970,3065 2952,3083 2170,3083 ; R29.1@3725,3386 3725,3105 3769,3061 4408,3061 4476.67,3129.67 R31.1@4476.67,3388
  Bottom Layer w20: v2(2607,6449) v2(2943,6449) ; v1(2969,3393) 2969,3363 2970,3362 v1(2970,3093)
  other v1: 423,4183 655,4742 655,4776 655,4810 648,5199 682,5199 716,5199 657,6280 691,6280 725,6280
  other v2: 2947,5411 2988,5411 4479,6051 1836,6333 1870,6333 1904,6333 1836,6370 1870,6370 1904,6370 3133.5,6735 3173,6735 3212.5,6735 3252,6735 3133.5,6778 3173,6778 3212.5,6778 3252,6778
5V: C1.1 C2.2 C6.2 C7.2 C17.2 C18.2 C25.2 C26.1 C35.1 C36.1 C37.1 C38.1 C39.1 C40.1 C41.1 D1.2 D10.2 D11.2 D12.2 D13.2 D14.2 D15.2 D16.2 FB1.2 K1.4 K2.3 K3.4 K4.4 K5.3 K6.4 K7.4 L1.1 R7.2 R24.2 R25.2 U1.7 U2.3 U4.5 U7.8 U8.7 | length 7233
  Top Layer w12: v1@705,4037 711,4037 v1(711,4036)
  Top Layer w50: C18.2@5068,5934 5331,5934 5438.91,5826.09 K7.4@5647.21,5826.09
  Bottom Layer w50: v1(675,6776) 675,6514 729,6460 2455,6460 2781,6134 2964,6134 3458,5640 5082,5640 5118,5676 v2(5118,5933) ; K5.3@5671.56,835.7 5671.56,1524.05 5758,1610.49 5758,2063
  other v1: 2430,2142 2473,2142 2430,2181.5 2473,2181.5 2430,2221 2473,2221 2452,2621 2495,2621 2452,2660.5 2495,2660.5 2452,2700 2495,2700 741,4036 648,4189 678,4189
12V-PUMP: J4.1 K1.5 K4.5 K7.5
  other v1: 5904.85,6198 5489,6202 5904.85,6394.85 5489,6398.85 5904.85,6591.7 5489,6595.7 5904.85,6788.55 5489,6792.55
12V_SENSORS: C3.1 C4.2 C22.2 C24.2 D2.2 J9.1 J11.1 U1.4
  other v1: 2688,1562.53 2688,1602.03 2688,1641.53
AC_MOTOR_9A: R45.1 U9.5 | length 3645.1
  Top Layer w12: U9.5@3091.84,5846.86 3091.84,5681.16 v2(3120,5653)
  Top Layer w22: R45.1@3329,2300 v1(3329,2334)
  Bottom Layer w22: v2(3120,5653) 3220,5553 3220,2443 v1(3329,2334)
AIN0: J12.1 U7.4
AIN1: J12.2 U7.5
AIR_PUMP_3A: R48.1 U9.7 | length 8932.6
  Top Layer w12: U9.7@3040.66,5846.86 3040.66,5907.66 3054,5921 3225,5921 3287,5859 v2(3287,5713)
  Top Layer w22: v2(5361,4838) v1@5946,4838 ; v1(5548,185) R48.1@5548,217
  Bottom Layer w22: v2(3287,5713) 3488,5512 5338,5512 5361,5489 v2(5361,4838) ; v1@5548.42,185.42 5885,185.42 5946,246.42 5946,4788.42 v1(5946,4837)
AIR_PUMP_15A: R40.1 U9.4 | length 4774.3
  Top Layer w22: U9.4@3117.43,5846.86 3117.43,5701.57 v2(3154,5665) ; R40.1@4510.87,2300 v1(4510.87,2334)
  Bottom Layer w22: v2(3154,5665) 3252,5567 3252,4314 3351,4215 4461,4215 4510.87,4165.13 v1(4510.87,2334)
ALERT_RDY: R23.1 U7.2 U9.8 | length 4280.6
  Top Layer w12: v1(398,4102.69) U7.2@486.89,4102.69 ; v2@3015.07,5744.2 U9.8@3015.07,5846.86
  Bottom Layer w12: v1(398,4102.69) 442.69,4058 593,4058 615.72,4080.72 615.72,4248.72 703,4336 2401.41,4336 2625,4559.59 2625,5679.13 2693.87,5748 v2(3014.29,5748)
BACK_HOME: C31.1 R29.2 SW6.1 SW6.2 U9.24 | length 2395.4
  Top Layer w12: U9.24@3091.84,5579.14 3091.84,5406.16 3723,4775 3723,3448 R29.2@3725,3446
DC_PUMP-1_12V: R38.1 U9.1 | length 5396.7
  Top Layer w12: v2(3193.42,5743) 3193.21,5743.21 3194.2,5744.2 U9.1@3194.2,5846.86
  Top Layer w22: v1(5345,2719) 5497,2719 5519,2697 R38.1@5519,2621.87
  Bottom Layer w22: v2(3193.42,5743) 3289,5647.42 3289,4333 3366,4256 5276,4256 5345,4187 v1(5345,2719)
DC_PUMP-2_12V: R44.1 U9.2 | length 3326.6
  Top Layer w12: U9.2@3168.61,5846.86 3168.61,5724.39 3299,5594 v2(3324,5594) v2@3326,5594
  Top Layer w22: v2(3324,5491) 3324,5462 4931.13,3854.87 R44.1@5519,3854.87
  Bottom Layer w22: v2(3324,5491) v2(3324,5594)
DC_PUMP-3_12V: R50.1 U9.3 | length 2755.6
  Top Layer w12: U9.3@3143.02,5846.86 3143.02,5714.89 3362.96,5494.96
  Top Layer w22: 3362.96,5494.96 3469.91,5388 4845,5388 5116,5117 R50.1@5519,5117
DCPUMP_GND: J4.2 J13.2 J16.2 J19.2
  other v1: 6518.75,6195 6027.9,6199 6518.75,6391.85 6027.9,6395.85 6518.75,6588.7 6027.9,6592.7 6518.75,6785.55 6027.9,6789.55
E-GND: J3.1 U1.1
  other v1: -30,2428.56 206.22,2428.56 -30,2664.78 206.22,2664.78 -30,2901 206.22,2901 516,2980.56 516,3216.78 -30,3373.44 516,3453
ESP-EN: C8.2 C10.1 J6.6 R1.1 SW1.3 SW1.4 U3.3 | length 1962.8
  Top Layer w12: v2@3002.72,6778.7 U3.3@3043.8,6778.7 ; v2(4194.43,6742.32) J6.6@4194.43,6792.3
  Top Layer w15: v2(3002.21,6778.19) v2@3002.72,6778.7 ; U3.3@3043.8,6778.7 U3.3@3044.31,6779.21
  Bottom Layer w12: v2(2501,6778) 2501.19,6778.19 v2(3002.21,6778.19) 3002.21,6680.79 3037,6646 4141,6646 4194.43,6699.43 v2(4194.43,6742.32)

## Text inside footprints (layer, text, board x,y; h text height)
J5: Top Overlay "1" at 3830.71,5829.48 h20; Top Overlay "PCB Edge" at 4175.6,5684.69 h31.5
J7: Top Overlay "PCB Edge" at 987.41,6912.53 h31.5 r180
K1: Top Overlay "1" at 5567.21,2831.85 h39.37
K4: Top Overlay "1" at 5567.21,4069.85 h39.37
K7: Top Overlay "1" at 5567.21,5331.65 h39.37
U1: Top Overlay "-Vo2" at 1917.78,1764.76 h59.06; Top Overlay "AC(N)" at 527.04,1949.91 h59.06; Top Overlay "AC(L)" at 530.44,1277.49 h59.06; Top Overlay "+Vo2" at 1917.78,1568.82 h59.06; Top Overlay "-Vo1" at 1943.08,2352.59 h59.06; Top Overlay "+Vo1" at 1943.08,2156.64 h59.06